# Altium PCB POV_Display.PcbDoc (part 2 of 4)
Units mm, origin at the board's own origin, x right, y up, seen from the top; angles counter-clockwise.
Board outline 207.01 x 48.01 mm, 4 copper layers (Top Layer, GND, Power, Bottom Layer), stack 1.586 mm thick; 227 components, 374 nets, 1196 pads, 657 vias.
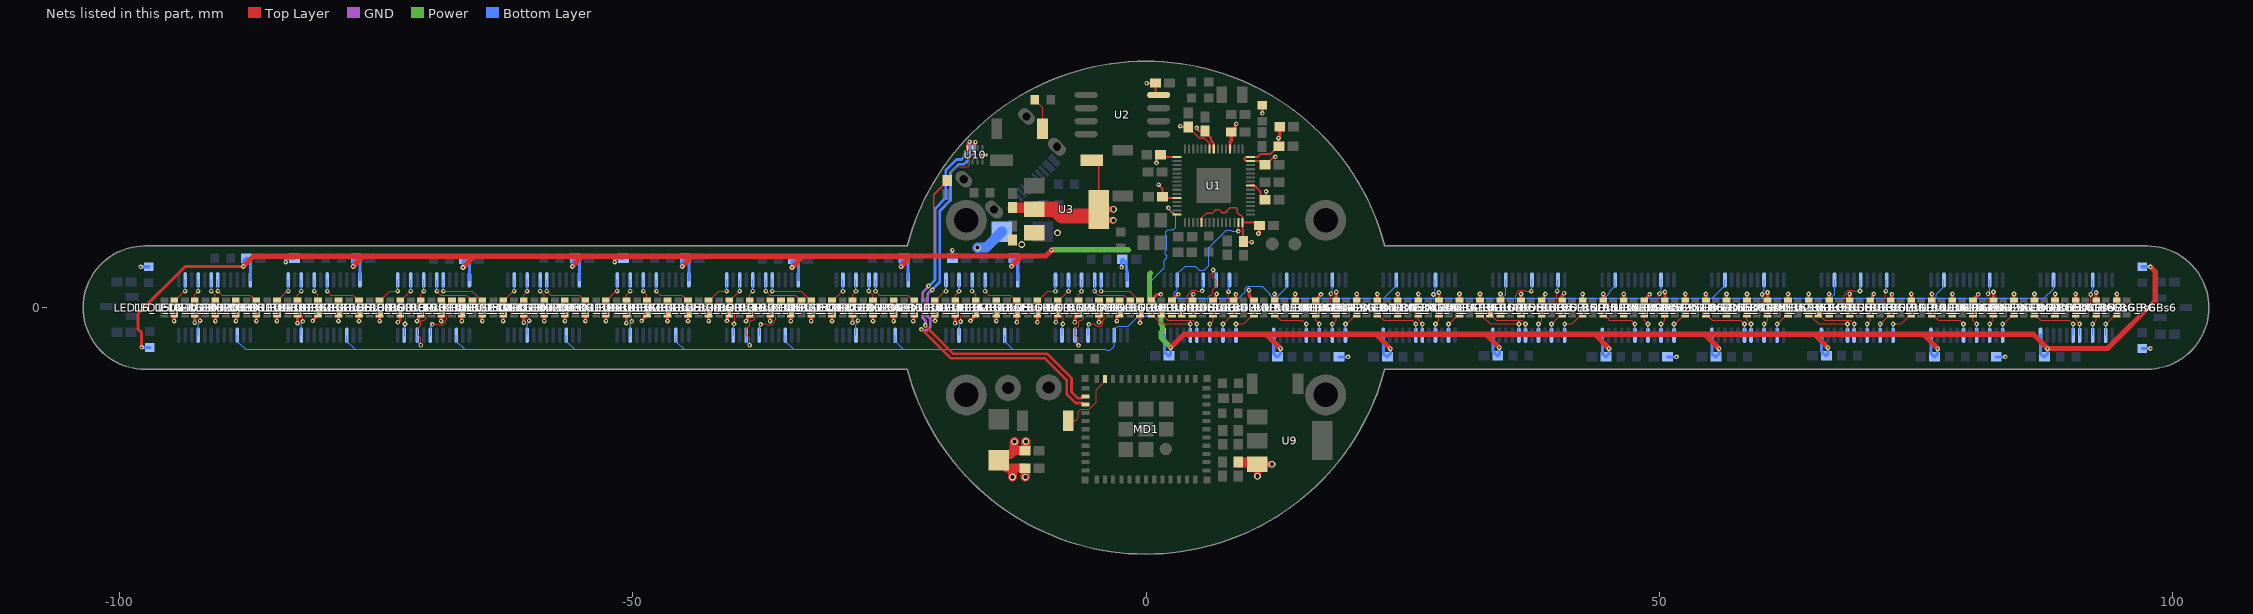
[diagram p4: the nets of this part, all layers, seen from the top]

## Via types
v1: diameter 0.45, hole 0.2, Top Layer to Bottom Layer, tented both sides, 605 vias
v2: diameter 0.65, hole 0.4, Top Layer to Bottom Layer, tented both sides, 28 vias
v3: diameter 0.5, hole 0.3, Top Layer to Bottom Layer, tented both sides, 12 vias
v4: diameter 0.45, hole 0.2, Top Layer to Bottom Layer, 12 vias

## Nets (pads, with @x,y where several pads share a name; then routed paths per layer and width w, separated by ;. In a path a pad name is that pad's centre, name@x,y a point inside that pad or via, vN(x,y) a via of type N, cw(c..) or ccw(c..) an arc to the next point about the centre after c; other vN are vias at no path point) (continued)
+3V3_RP: C4.2 C5.2 C6.2 C7.2 C8.2 C9.2 C10.2 C11.2 C12.2 C13.2 C15.2 C17.1 C21.2 C28_U_16_RGBs1.1 C28_U_16_RGBs2.1 C28_U_16_RGBs3.1 C28_U_16_RGBs4.1 C28_U_16_RGBs5.1 C28_U_16_RGBs6.1 C29_U_16_RGBs1.1 C29_U_16_RGBs2.1 C29_U_16_RGBs3.1 C29_U_16_RGBs4.1 C29_U_16_RGBs5.1 C29_U_16_RGBs6.1 C30_U_16_RGBs1.1 C30_U_16_RGBs2.1 C30_U_16_RGBs3.1 C30_U_16_RGBs4.1 C30_U_16_RGBs5.1 C30_U_16_RGBs6.1 C37.2 R3.1 R10.2 R11.2 SW5.1 U1.1 U1.11 U1.20 U1.30 U1.38 U1.44 U1.45 U1.49 U1.53 U1.54 U2.8 U3.2 U3.4 U6_U_16_RGBs1.24 U6_U_16_RGBs2.24 U6_U_16_RGBs3.24 U6_U_16_RGBs4.24 U6_U_16_RGBs5.24 U6_U_16_RGBs6.24 U7_U_16_RGBs1.24 U7_U_16_RGBs2.24 U7_U_16_RGBs3.24 U7_U_16_RGBs4.24 U7_U_16_RGBs5.24 U7_U_16_RGBs6.24 U8_U_16_RGBs1.24 U8_U_16_RGBs2.24 U8_U_16_RGBs3.24 U8_U_16_RGBs4.24 U8_U_16_RGBs5.24 U8_U_16_RGBs6.24 U10.10 | length 368.5
  Top Layer w0.1: C37.2@-19.35,12.379 -18.962,12.767 -18.962,13.126 -18.376,13.712 -17.33,13.712 -17.15,13.892 -17.15,14.508 -16.783,14.875 U10.10@-15.75,14.875
  Top Layer w0.15: -20.675,5.025 -20.675,10.981 -19.35,12.306 C37.2@-19.35,12.379 ; SW5.1@-5.275,14.35 -5.075,14.35 -4.6,13.875 U3.4@-4.6,9.575 ; C9.2@4.316,17.332 4.506,17.142 4.571,17.142 4.926,16.787 5.238,16.475 5.714,16.475 6.2,15.989 U1.54@6.2,15.45 ; U1.20@5.4,8.722 5.853,9.175 6.425,9.175 6.8,9.55 7.116,9.55 7.417,9.248 7.708,9.248 8.182,9.723 8.82,9.723 8.908,9.635 8.908,9.248 9.178,8.978 9.258,8.978 9.398,8.839 U1.30@9.398,8.3
  Top Layer w0.2: v1(0.067,21.85) 0.896,21.85 C17.1@0.921,21.875 0.921,20.904 1.12,20.705 U2.8@1.231,20.705 ; v1(1.025,14.094) C12.2@1.025,14.544 ; C12.2@1.2,14.544 1.556,14.9 1.6,14.9 C12.2@1.825,14.675 ; v1(1.225,11.981) 1.225,11.954 1.6,11.579 C11.2@1.6,10.8 1.725,10.675 U1.11@3.025,10.675 ; C12.2@1.65,14.675 U1.1@2.85,14.675 ; v1(3.344,17.675) 3.412,17.675 3.491,17.596 C9.2@4.125,17.596 ; v1(4.925,17.5) 4.925,17.432 5.031,17.326 5.031,17.284 5.119,17.196 C10.2@5.75,17.196 ; U1.20@5.4,8.3 U1.20@5.4,8.722 ; C10.2@5.75,17.123 6.321,16.552 6.321,16.279 6.475,16.126 ; 6.475,16.126 6.598,16.002 U1.53@6.599,15.45 ; U1.38@10.175,11.874 10.511,11.874 10.61,11.775 10.695,11.775 11.171,11.299 11.171,10.856 11.527,10.5 C6.2@11.6,10.5 11.7,10.6 v1(11.7,11.306) ; U1.45@10.175,14.675 9.717,14.675 9.6,14.558 9.6,14.392 9.717,14.274 U1.44@10.175,14.274 11.153,14.274 11.527,13.9 C5.2@11.6,13.9 11.673,13.9 12.406,14.633 12.552,14.633 v1(12.6,14.681) ; U1.45@10.175,14.675 10.895,14.675 11.191,14.971 12.144,14.971 12.873,15.7 C4.2@12.9,15.7 ; v1(10.281,6.375) 10.256,6.4 9.554,6.4 9.425,6.529 9.425,7.601 9.398,7.628 U1.30@9.398,8.3 10.6,8.3 C7.2@10.95,7.95 ; v1(12.9,16.506) 12.9,15.746 C4.2@12.946,15.7
  Top Layer w0.3: v1(-97.806,-3.877) -97.806,-2.454 -98.175,-2.085 -98.175,-0.604 -93.57,4.002 v1(-87.9,4.002) ; U1.49@8.199,15.45 8.198,15.451 8.198,16.141 8.3,16.244 C15.2@8.3,17.1 8.373,17.1 8.679,17.406 8.679,17.679 8.771,17.771 8.771,17.877 v1(8.8,17.906) ; v1(10.954,7.219) 10.954,7.26 11.05,7.356 C7.2@11.05,8 ; v1(11.325,18.924) R3.1@11.325,19.703 ; v1(12.9,16.506) 12.929,16.535 12.929,16.637 13.021,16.729 C13.2@13.021,17.625
  Top Layer w0.5: v1(-87.9,4.002) -86.902,5 -76.202,5 ; v1(-77.2,4.002) -76.202,5 ; v1(-66.507,3.902) -65.409,5 ; v1(-55.864,4.002) -54.866,5 ; v1(-45.164,4.002) -44.166,5 ; v1(-34.471,3.902) -33.373,5 ; v1(-23.846,3.994) -23.265,4.576 -23.265,4.824 -23.44,5 -33.373,5 ; -23.587,5.025 -20.675,5.025 -12.094,5.025 ; v1(-13.1,4.019) -12.094,5.025 ; v1(-9.184,5.6) -9.759,5.025 -12.094,5.025 ; v1(2.4,-3.894) 3.693,-2.6 11.699,-2.6 ; v1(13.093,-3.994) 11.699,-2.6 ; v1(23.793,-3.994) 22.399,-2.6 ; v1(34.4,-3.894) 33.106,-2.6 ; v1(45.093,-3.994) 43.699,-2.6 ; v1(55.792,-3.994) 54.399,-2.6 ; v1(66.4,-3.894) 65.106,-2.6 ; v1(77.093,-3.994) 75.699,-2.6 ; v1(97.806,3.977) 98.275,3.508 98.275,0.662 93.619,-3.994 v1(87.793,-3.994) 86.399,-2.6 75.699,-2.6 ; -76.202,5 -65.409,5 ; -65.409,5 -54.866,5 ; -54.866,5 -44.166,5 ; -44.166,5 -33.373,5 ; 11.699,-2.6 22.399,-2.6 ; 22.399,-2.6 33.106,-2.6 ; 33.106,-2.6 43.699,-2.6 ; 43.699,-2.6 54.399,-2.6 ; 54.399,-2.6 65.106,-2.6 ; 65.106,-2.6 75.699,-2.6
  Top Layer w0.65: v2(-3.175,8.5) -3.925,8.5 -4.6,9.175 U3.4@-4.6,9.575 v2(-3.15,9.575)
  Top Layer w1: C21.2@-13,9.746 -12.971,9.717 -11.042,9.717 U3.2@-10.9,9.575
  Top Layer w1.5: U3.2@-10.9,9.575 -8.814,9.575 -8.164,8.925 -4.85,8.925 U3.4@-4.6,9.175
  Power w0.5: v1(-9.184,5.6) -9.148,5.636 -1.736,5.636 -1.7,5.6 ; 0.45,3.35 0.35,3.25 0.35,0.853 1.45,-0.247 1.45,-1.612 1.6,-1.762 1.6,-2.238 1.45,-2.388 1.45,-2.944 v1(2.4,-3.894)
  Bottom Layer w0.3: v1(-97.806,-3.877) R10.2@-97,-3.877 ; v1(-87.9,4.002) -87.9,4.515 C30_U_16_RGBs3.1@-87.607,4.808 -87.534,4.808 -87.215,4.488 U8_U_16_RGBs3.24@-87.215,2.7 ; v1(-77.2,4.002) -77.2,4.515 C29_U_16_RGBs3.1@-76.908,4.808 -76.851,4.808 -76.545,4.502 U7_U_16_RGBs3.24@-76.545,2.7 ; v1(-66.507,3.902) -66.507,4.562 C28_U_16_RGBs3.1@-66.361,4.708 -66.288,4.708 -65.896,4.315 -65.896,2.711 U6_U_16_RGBs3.24@-65.885,2.7 ; v1(-55.864,4.002) -55.864,4.516 C30_U_16_RGBs2.1@-55.571,4.808 -55.498,4.808 -55.179,4.489 U8_U_16_RGBs2.24@-55.179,2.701 ; v1(-45.164,4.002) -45.164,4.516 C29_U_16_RGBs2.1@-44.871,4.808 -44.815,4.808 -44.509,4.502 U7_U_16_RGBs2.24@-44.509,2.701 ; v1(-34.471,3.902) -34.471,4.563 C28_U_16_RGBs2.1@-34.325,4.708 -34.252,4.708 -33.859,4.315 -33.859,2.711 U6_U_16_RGBs2.24@-33.849,2.701 ; v1(-23.846,3.994) -23.846,4.507 C30_U_16_RGBs1.1@-23.554,4.8 -23.481,4.8 -23.161,4.481 U8_U_16_RGBs1.24@-23.161,2.692 ; v1(-13.1,4.019) -13.1,4.554 C29_U_16_RGBs1.1@-12.854,4.8 -12.798,4.8 -12.491,4.494 U7_U_16_RGBs1.24@-12.491,2.692 ; v1(-2.376,3.919) -2.376,4.631 C28_U_16_RGBs1.1@-2.308,4.7 -2.235,4.7 -1.929,4.394 -1.929,4.143 -1.89,4.105 -1.89,3.685 -1.842,3.636 -1.842,2.703 U6_U_16_RGBs1.24@-1.831,2.692 ; U6_U_16_RGBs4.24@1.777,-2.692 1.788,-2.703 1.788,-4.307 2.181,-4.7 C28_U_16_RGBs4.1@2.254,-4.7 2.4,-4.554 v1(2.4,-3.894) ; U7_U_16_RGBs4.24@12.438,-2.692 12.438,-4.494 12.744,-4.8 C29_U_16_RGBs4.1@12.8,-4.8 13.093,-4.508 v1(13.093,-3.994) ; U8_U_16_RGBs4.24@23.108,-2.692 23.108,-4.481 23.427,-4.8 C30_U_16_RGBs4.1@23.5,-4.8 23.793,-4.507 v1(23.793,-3.994) ; U6_U_16_RGBs5.24@33.777,-2.692 33.788,-2.703 33.788,-4.307 34.181,-4.7 C28_U_16_RGBs5.1@34.254,-4.7 34.4,-4.554 v1(34.4,-3.894) ; U7_U_16_RGBs5.24@44.438,-2.692 44.438,-4.494 44.744,-4.8 C29_U_16_RGBs5.1@44.8,-4.8 45.093,-4.508 v1(45.093,-3.994) ; U8_U_16_RGBs5.24@55.107,-2.692 55.107,-4.481 55.427,-4.8 C30_U_16_RGBs5.1@55.5,-4.8 55.792,-4.507 v1(55.792,-3.994) ; U6_U_16_RGBs6.24@65.778,-2.692 65.788,-2.703 65.788,-4.307 66.181,-4.7 C28_U_16_RGBs6.1@66.254,-4.7 66.4,-4.554 v1(66.4,-3.894) ; U7_U_16_RGBs6.24@76.438,-2.692 76.438,-4.494 76.744,-4.8 C29_U_16_RGBs6.1@76.8,-4.8 77.093,-4.508 v1(77.093,-3.994) ; U8_U_16_RGBs6.24@87.108,-2.692 87.108,-4.481 87.427,-4.8 C30_U_16_RGBs6.1@87.5,-4.8 87.793,-4.507 v1(87.793,-3.994) ; R11.2@97,3.977 v1(97.806,3.977)
+5V: C20.2 C22.1 C23.1 C31_U_16_RGBs1.2 C31_U_16_RGBs2.2 C31_U_16_RGBs3.2 C31_U_16_RGBs4.2 C31_U_16_RGBs5.2 C31_U_16_RGBs6.2 C35.2 D1.1 D2.1 LED1_U_16_RGBs1.2 LED1_U_16_RGBs2.2 LED1_U_16_RGBs3.2 LED1_U_16_RGBs4.2 LED1_U_16_RGBs5.2 LED1_U_16_RGBs6.2 LED2_U_16_RGBs1.2 LED2_U_16_RGBs2.2 LED2_U_16_RGBs3.2 LED2_U_16_RGBs4.2 LED2_U_16_RGBs5.2 LED2_U_16_RGBs6.2 LED3_U_16_RGBs1.2 LED3_U_16_RGBs2.2 LED3_U_16_RGBs3.2 LED3_U_16_RGBs4.2 LED3_U_16_RGBs5.2 LED3_U_16_RGBs6.2 LED4_U_16_RGBs1.2 LED4_U_16_RGBs2.2 LED4_U_16_RGBs3.2 LED4_U_16_RGBs4.2 LED4_U_16_RGBs5.2 LED4_U_16_RGBs6.2 LED5_U_16_RGBs1.2 LED5_U_16_RGBs2.2 LED5_U_16_RGBs3.2 LED5_U_16_RGBs4.2 LED5_U_16_RGBs5.2 LED5_U_16_RGBs6.2 LED6_U_16_RGBs1.2 LED6_U_16_RGBs2.2 LED6_U_16_RGBs3.2 LED6_U_16_RGBs4.2 LED6_U_16_RGBs5.2 LED6_U_16_RGBs6.2 LED7_U_16_RGBs1.2 LED7_U_16_RGBs2.2 LED7_U_16_RGBs3.2 LED7_U_16_RGBs4.2 LED7_U_16_RGBs5.2 LED7_U_16_RGBs6.2 LED8_U_16_RGBs1.2 LED8_U_16_RGBs2.2 LED8_U_16_RGBs3.2 LED8_U_16_RGBs4.2 LED8_U_16_RGBs5.2 LED8_U_16_RGBs6.2 LED9_U_16_RGBs1.2 LED9_U_16_RGBs2.2 LED9_U_16_RGBs3.2 LED9_U_16_RGBs4.2 LED9_U_16_RGBs5.2 LED9_U_16_RGBs6.2 LED10_U_16_RGBs1.2 LED10_U_16_RGBs2.2 LED10_U_16_RGBs3.2 LED10_U_16_RGBs4.2 LED10_U_16_RGBs5.2 LED10_U_16_RGBs6.2 LED11_U_16_RGBs1.2 LED11_U_16_RGBs2.2 LED11_U_16_RGBs3.2 LED11_U_16_RGBs4.2 LED11_U_16_RGBs5.2 LED11_U_16_RGBs6.2 LED12_U_16_RGBs1.2 LED12_U_16_RGBs2.2 LED12_U_16_RGBs3.2 LED12_U_16_RGBs4.2 LED12_U_16_RGBs5.2 LED12_U_16_RGBs6.2 LED13_U_16_RGBs1.2 LED13_U_16_RGBs2.2 LED13_U_16_RGBs3.2 LED13_U_16_RGBs4.2 LED13_U_16_RGBs5.2 LED13_U_16_RGBs6.2 LED14_U_16_RGBs1.2 LED14_U_16_RGBs2.2 LED14_U_16_RGBs3.2 LED14_U_16_RGBs4.2 LED14_U_16_RGBs5.2 LED14_U_16_RGBs6.2 LED15_U_16_RGBs1.2 LED15_U_16_RGBs2.2 LED15_U_16_RGBs3.2 LED15_U_16_RGBs4.2 LED15_U_16_RGBs5.2 LED15_U_16_RGBs6.2 LED16_U_16_RGBs1.2 LED16_U_16_RGBs2.2 LED16_U_16_RGBs3.2 LED16_U_16_RGBs4.2 LED16_U_16_RGBs5.2 LED16_U_16_RGBs6.2 R9.2 R12.2 U3.3 U9.3 | length 98.9
  Top Layer w0.3: v1(-94.632,-1.313) LED16_U_16_RGBs3.2@-94.632,-0.612 ; v1(-92.632,-1.467) LED15_U_16_RGBs3.2@-92.632,-0.612 ; v1(-90.632,-1.313) LED14_U_16_RGBs3.2@-90.632,-0.612 ; v1(-88.632,-1.313) LED13_U_16_RGBs3.2@-88.632,-0.612 ; v1(-86.632,-1.313) LED12_U_16_RGBs3.2@-86.632,-0.612 ; v1(-84.632,-1.313) LED11_U_16_RGBs3.2@-84.632,-0.612 ; v1(-82.632,-1.517) LED10_U_16_RGBs3.2@-82.632,-0.612 ; v1(-81.15,-1.282) -81.15,-1.258 -80.857,-0.966 -80.857,-0.813 -80.657,-0.612 LED9_U_16_RGBs3.2@-80.632,-0.612 ; v1(-78.632,-1.313) LED8_U_16_RGBs3.2@-78.632,-0.612 ; v1(-76.632,-1.313) LED7_U_16_RGBs3.2@-76.632,-0.612 ; v1(-74.632,-1.313) LED6_U_16_RGBs3.2@-74.632,-0.612 ; v1(-72.85,-1.425) -72.632,-1.207 LED5_U_16_RGBs3.2@-72.632,-0.612 ; v1(-70.991,-1.313) -70.991,-1.272 -70.857,-1.138 -70.857,-0.813 -70.657,-0.612 LED4_U_16_RGBs3.2@-70.632,-0.612 ; v1(-68.632,-1.313) LED3_U_16_RGBs3.2@-68.632,-0.612 ; v1(-66.632,-1.313) LED2_U_16_RGBs3.2@-66.632,-0.612 ; v1(-64.632,-1.313) LED1_U_16_RGBs3.2@-64.632,-0.612 ; v1(-62.596,-1.312) LED16_U_16_RGBs2.2@-62.596,-0.612 ; v1(-60.596,-1.467) LED15_U_16_RGBs2.2@-60.596,-0.612 ; v1(-58.596,-1.312) LED14_U_16_RGBs2.2@-58.596,-0.612 ; v1(-56.596,-1.312) LED13_U_16_RGBs2.2@-56.596,-0.612 ; v1(-54.596,-1.312) LED12_U_16_RGBs2.2@-54.596,-0.612 ; v1(-52.596,-1.312) LED11_U_16_RGBs2.2@-52.596,-0.612 ; v1(-50.596,-1.517) LED10_U_16_RGBs2.2@-50.596,-0.612 ; v1(-49.113,-1.282) -49.113,-1.257 -48.821,-0.965 -48.821,-0.812 -48.62,-0.612 LED9_U_16_RGBs2.2@-48.596,-0.612 ; v1(-46.596,-1.312) LED8_U_16_RGBs2.2@-46.596,-0.612 ; v1(-44.596,-1.312) LED7_U_16_RGBs2.2@-44.596,-0.612 ; v1(-42.596,-1.312) LED6_U_16_RGBs2.2@-42.596,-0.612 ; v1(-40.8,-1.287) -40.771,-1.258 -40.771,-0.787 LED5_U_16_RGBs2.2@-40.596,-0.612 ; v1(-38.955,-1.312) -38.955,-1.272 -38.821,-1.137 -38.821,-0.812 -38.62,-0.612 LED4_U_16_RGBs2.2@-38.596,-0.612 ; v1(-36.596,-1.312) LED3_U_16_RGBs2.2@-36.596,-0.612 ; v1(-34.596,-1.312) LED2_U_16_RGBs2.2@-34.596,-0.612 ; v1(-32.596,-1.312) LED1_U_16_RGBs2.2@-32.596,-0.612 ; v1(-30.579,-1.32) LED16_U_16_RGBs1.2@-30.579,-0.62 ; v1(-28.579,-1.475) LED15_U_16_RGBs1.2@-28.579,-0.62 ; v1(-26.579,-1.32) LED14_U_16_RGBs1.2@-26.579,-0.62 ; v1(-24.579,-1.32) LED13_U_16_RGBs1.2@-24.579,-0.62 ; v1(-22.664,-1.32) -22.664,-1.28 -22.579,-1.194 LED12_U_16_RGBs1.2@-22.579,-0.62 ; LED11_U_16_RGBs1.2@-20.579,-0.62 -20.563,-0.635 -20.563,-1.28 v1(-20.548,-1.295) ; v1(-18.579,-1.525) LED10_U_16_RGBs1.2@-18.579,-0.62 ; v1(-17.096,-1.29) -17.096,-1.266 -16.804,-0.973 -16.804,-0.82 -16.603,-0.62 LED9_U_16_RGBs1.2@-16.579,-0.62 ; v1(-14.579,-1.32) LED8_U_16_RGBs1.2@-14.579,-0.62 ; v1(-12.579,-1.425) LED7_U_16_RGBs1.2@-12.579,-0.62 ; v1(-10.579,-1.425) LED6_U_16_RGBs1.2@-10.579,-0.62 ; v1(-8.775,-1.425) -8.746,-1.396 -8.746,-0.787 LED5_U_16_RGBs1.2@-8.579,-0.62 ; v1(-6.938,-1.425) -6.909,-1.396 -6.909,-1.079 -6.804,-0.973 -6.804,-0.82 -6.603,-0.62 LED4_U_16_RGBs1.2@-6.579,-0.62 ; v1(-4.579,-1.425) LED3_U_16_RGBs1.2@-4.579,-0.62 ; v1(-2.841,-1.32) -2.841,-1.28 -2.804,-1.242 -2.804,-0.82 -2.603,-0.62 LED2_U_16_RGBs1.2@-2.579,-0.62 ; v1(-0.583,-1.479) -0.581,-1.477 -0.581,-0.622 LED1_U_16_RGBs1.2@-0.579,-0.62 ; LED1_U_16_RGBs4.2@0.525,0.62 0.549,0.62 0.75,0.82 0.75,0.973 1.043,1.267 1.413,1.267 v1(1.441,1.295) ; LED2_U_16_RGBs4.2@2.525,0.62 2.549,0.62 2.75,0.82 2.75,0.973 2.997,1.22 3.032,1.22 3.107,1.295 v1(3.148,1.295) ; LED3_U_16_RGBs4.2@4.525,0.62 4.525,1.173 4.613,1.261 v1(4.613,1.302) ; LED4_U_16_RGBs4.2@6.525,0.62 6.549,0.62 6.75,0.82 6.75,1.146 6.884,1.28 v1(6.884,1.32) ; LED5_U_16_RGBs4.2@8.525,0.62 8.721,0.816 8.721,1.267 v1(8.75,1.295) ; v1(10.018,1.711) 10.047,1.682 10.047,1.242 10.1,1.189 10.1,1.021 10.501,0.62 LED6_U_16_RGBs4.2@10.525,0.62 ; LED7_U_16_RGBs4.2@12.525,0.62 v1(12.525,1.32) ; LED8_U_16_RGBs4.2@14.525,0.62 v1(14.525,1.32) ; LED9_U_16_RGBs4.2@16.525,0.62 16.549,0.62 16.75,0.82 16.75,0.973 17.042,1.266 v1(17.042,1.29) ; LED10_U_16_RGBs4.2@18.525,0.62 v1(18.525,1.525) ; LED11_U_16_RGBs4.2@20.525,0.62 v1(20.525,1.32) ; LED12_U_16_RGBs4.2@22.525,0.62 v1(22.525,1.32) ; LED13_U_16_RGBs4.2@24.525,0.62 v1(24.525,1.32) ; LED14_U_16_RGBs4.2@26.525,0.62 v1(26.525,1.32) ; LED15_U_16_RGBs4.2@28.525,0.62 v1(28.525,1.475) ; LED16_U_16_RGBs4.2@30.525,0.62 v1(30.525,1.32) ; LED1_U_16_RGBs5.2@32.525,0.62 v1(32.525,1.32) ; LED2_U_16_RGBs5.2@34.525,0.62 v1(34.525,1.32) ; LED3_U_16_RGBs5.2@36.525,0.62 v1(36.525,1.32) ; LED4_U_16_RGBs5.2@38.525,0.62 38.549,0.62 38.75,0.82 38.75,1.146 38.884,1.28 v1(38.884,1.32) ; LED5_U_16_RGBs5.2@40.525,0.62 40.525,1.2 v1(40.725,1.4) ; LED6_U_16_RGBs5.2@42.525,0.62 v1(42.525,1.32) ; LED7_U_16_RGBs5.2@44.525,0.62 v1(44.525,1.32) ; LED8_U_16_RGBs5.2@46.525,0.62 v1(46.525,1.32) ; LED9_U_16_RGBs5.2@48.525,0.62 48.549,0.62 48.75,0.82 48.75,0.973 49.042,1.266 v1(49.042,1.29) ; LED10_U_16_RGBs5.2@50.525,0.62 v1(50.525,1.525) ; LED11_U_16_RGBs5.2@52.525,0.62 v1(52.525,1.32) ; LED12_U_16_RGBs5.2@54.525,0.62 v1(54.525,1.32) ; LED13_U_16_RGBs5.2@56.525,0.62 v1(56.525,1.32) ; LED14_U_16_RGBs5.2@58.525,0.62 v1(58.525,1.32) ; LED15_U_16_RGBs5.2@60.525,0.62 v1(60.525,1.475) ; LED16_U_16_RGBs5.2@62.525,0.62 v1(62.525,1.32) ; LED1_U_16_RGBs6.2@64.525,0.62 v1(64.525,1.32) ; LED2_U_16_RGBs6.2@66.525,0.62 v1(66.525,1.32) ; LED3_U_16_RGBs6.2@68.525,0.62 v1(68.525,1.32) ; LED4_U_16_RGBs6.2@70.525,0.62 70.549,0.62 70.75,0.82 70.75,1.146 70.884,1.28 v1(70.884,1.32) ; LED5_U_16_RGBs6.2@72.525,0.62 72.596,0.691 72.596,1.267 v1(72.625,1.295) ; LED6_U_16_RGBs6.2@74.525,0.62 v1(74.525,1.32) ; LED7_U_16_RGBs6.2@76.525,0.62 v1(76.525,1.32) ; LED8_U_16_RGBs6.2@78.525,0.62 v1(78.525,1.32) ; LED9_U_16_RGBs6.2@80.525,0.62 80.549,0.62 80.75,0.82 80.75,0.973 81.042,1.266 v1(81.042,1.29) ; LED10_U_16_RGBs6.2@82.525,0.62 v1(82.525,1.525) ; LED11_U_16_RGBs6.2@84.525,0.62 v1(84.525,1.32) ; LED12_U_16_RGBs6.2@86.525,0.62 v1(86.525,1.32) ; LED13_U_16_RGBs6.2@88.525,0.62 v1(88.525,1.32) ; LED14_U_16_RGBs6.2@90.525,0.62 v1(90.525,1.32) ; LED15_U_16_RGBs6.2@92.525,0.62 v1(92.525,1.475) ; LED16_U_16_RGBs6.2@94.525,0.62 94.536,0.63 94.536,1.312 v1(94.546,1.323)
  Top Layer w0.65: v2(10.85,-16.425) U9.3@10.85,-15.25 v2(12.275,-15.25)
  Top Layer w0.9: v2(-13,-16.5) -13,-15.625 ; v2(-12.8,-13.05) -12.8,-13.1 -12.854,-13.154 -12.854,-13.925 ; v2(-11.75,-16.506) -11.75,-15.631 -11.756,-15.625 C23.1@-11.779,-15.625 -13,-15.625 ; v2(-11.7,-13.044) -11.7,-13.919 -11.706,-13.925 C22.1@-11.775,-13.925 -12.854,-13.925 ; -13,-15.625 -13.55,-15.625 D2.1@-14.325,-14.85 -13.775,-14.3 -13.229,-14.3 -12.854,-13.925
  Top Layer w1: C35.2@9,-15.05 9.029,-15.079 10.679,-15.079 U9.3@10.85,-15.25
  Bottom Layer w0.3: v1(-97.906,3.977) R9.2@-97.1,3.977 ; v1(-83.787,4.425) -83.781,4.431 -83.781,4.683 -83.664,4.8 -82.915,4.8 C31_U_16_RGBs3.2@-82.907,4.808 ; v1(-51.75,4.425) -51.744,4.431 -51.744,4.683 -51.627,4.8 -50.879,4.8 C31_U_16_RGBs2.2@-50.871,4.808 ; C31_U_16_RGBs1.2@-18.854,4.8 -18.854,5.596 v1(-18.85,5.6) ; C31_U_16_RGBs4.2@18.8,-4.8 v1(19.679,-4.8) ; C31_U_16_RGBs5.2@50.8,-4.8 v1(51.679,-4.8) ; C31_U_16_RGBs6.2@82.8,-4.8 v1(83.679,-4.8) ; R12.2@97,-3.977 v1(97.806,-3.977)
  Bottom Layer w1: v2(-16.392,5.841) -16.378,5.856 -15.569,5.856 D1.1@-14.05,7.375
  other v2: -12.1,6.15 -8.625,7.275
B0_U_16_RGBs1: LED1_U_16_RGBs1.1 U6_U_16_RGBs1.20 | length 5.3
  Top Layer w0.1: v1(-4.371,1.592) -1.564,1.592 -1.004,1.032 -1.004,1.021 -0.603,0.62 LED1_U_16_RGBs1.1@-0.579,0.62
  Bottom Layer w0.1: v1(-4.371,1.592) U6_U_16_RGBs1.20@-4.371,2.692
B0_U_16_RGBs2: LED1_U_16_RGBs2.1 U6_U_16_RGBs2.20 | length 5.3
  Top Layer w0.1: v1(-36.389,1.6) -33.581,1.6 -33.022,1.041 -33.022,1.029 -32.62,0.628 LED1_U_16_RGBs2.1@-32.596,0.628
  Bottom Layer w0.1: v1(-36.389,1.6) U6_U_16_RGBs2.20@-36.389,2.701
B0_U_16_RGBs3: LED1_U_16_RGBs3.1 U6_U_16_RGBs3.20 | length 5.3
  Top Layer w0.1: v1(-68.425,1.599) -65.617,1.599 -65.058,1.04 -65.058,1.029 -64.657,0.627 LED1_U_16_RGBs3.1@-64.632,0.627
  Bottom Layer w0.1: v1(-68.425,1.599) U6_U_16_RGBs3.20@-68.425,2.7
B0_U_16_RGBs4: LED1_U_16_RGBs4.1 U6_U_16_RGBs4.20 | length 5.3
  Top Layer w0.1: LED1_U_16_RGBs4.1@0.525,-0.62 0.549,-0.62 0.95,-1.021 0.95,-1.032 1.51,-1.592 v1(4.317,-1.592)
  Bottom Layer w0.1: U6_U_16_RGBs4.20@4.317,-2.692 v1(4.317,-1.592)
B0_U_16_RGBs5: LED1_U_16_RGBs5.1 U6_U_16_RGBs5.20 | length 5.3
  Top Layer w0.1: LED1_U_16_RGBs5.1@32.525,-0.62 32.549,-0.62 32.95,-1.021 32.95,-1.032 33.51,-1.592 v1(36.317,-1.592)
  Bottom Layer w0.1: U6_U_16_RGBs5.20@36.317,-2.692 v1(36.317,-1.592)
B0_U_16_RGBs6: LED1_U_16_RGBs6.1 U6_U_16_RGBs6.20 | length 5.3
  Top Layer w0.1: LED1_U_16_RGBs6.1@64.525,-0.62 64.549,-0.62 64.95,-1.021 64.95,-1.032 65.51,-1.592 v1(68.318,-1.592)
  Bottom Layer w0.1: U6_U_16_RGBs6.20@68.318,-2.692 v1(68.318,-1.592)
B1_U_16_RGBs1: LED2_U_16_RGBs1.1 U6_U_16_RGBs1.7 | length 5.9
  Top Layer w0.1: v1(-5.558,-1.624) -5.526,-1.592 -5.037,-1.592 -4.933,-1.695 -4.839,-1.695 -4.734,-1.8 -4.424,-1.8 -4.204,-1.58 -4.204,-1.476 -4.204,-1.296 -4.054,-1.146 -4.054,-0.208 -3.846,0 -3.211,0 -3.004,0.207 -3.004,0.219 -2.603,0.62 LED2_U_16_RGBs1.1@-2.579,0.62
  Bottom Layer w0.1: U6_U_16_RGBs1.7@-5.641,-2.692 -5.641,-1.802 -5.558,-1.719 v1(-5.558,-1.624)
B1_U_16_RGBs2: LED2_U_16_RGBs2.1 U6_U_16_RGBs2.7 | length 5.7
  Top Layer w0.1: v1(-37.525,-1.625) -37.484,-1.584 -37.054,-1.584 -36.951,-1.687 -36.441,-1.687 -36.221,-1.467 -36.221,-1.288 -36.071,-1.138 -36.071,-0.199 -35.864,0.008 -35.229,0.008 -35.022,0.215 -35.022,0.227 -34.62,0.628 LED2_U_16_RGBs2.1@-34.596,0.628
  Bottom Layer w0.1: U6_U_16_RGBs2.7@-37.659,-2.684 -37.61,-2.635 -37.61,-1.805 -37.525,-1.72 v1(-37.525,-1.625)
B1_U_16_RGBs3: LED2_U_16_RGBs3.1 U6_U_16_RGBs3.7 | length 5.7
  Top Layer w0.1: v1(-69.5,-1.625) -69.475,-1.6 -69.075,-1.6 -68.987,-1.688 -68.477,-1.688 -68.257,-1.468 -68.257,-1.289 -68.107,-1.139 -68.107,-0.2 -67.9,0.008 -67.265,0.008 -67.058,0.215 -67.058,0.226 -66.657,0.627 LED2_U_16_RGBs3.1@-66.632,0.627
  Bottom Layer w0.1: U6_U_16_RGBs3.7@-69.695,-2.685 -69.646,-2.636 -69.646,-1.866 -69.5,-1.72 v1(-69.5,-1.625)
B1_U_16_RGBs4: LED2_U_16_RGBs4.1 U6_U_16_RGBs4.7 | length 5.7
  Top Layer w0.1: LED2_U_16_RGBs4.1@2.525,-0.62 2.549,-0.62 2.95,-0.219 2.95,-0.207 3.157,0 3.792,0 4,0.208 4,1.133 4.246,1.379 4.246,1.465 4.476,1.695 4.88,1.695 4.983,1.592 5.442,1.592 v1(5.475,1.625)
  Bottom Layer w0.1: v1(5.475,1.625) 5.539,1.689 5.539,2.643 U6_U_16_RGBs4.7@5.587,2.692
B1_U_16_RGBs5: LED2_U_16_RGBs5.1 U6_U_16_RGBs5.7 | length 5.8
  Top Layer w0.1: LED2_U_16_RGBs5.1@34.525,-0.62 34.549,-0.62 34.95,-0.219 34.95,-0.207 35.157,0 35.792,0 36,0.208 36,1.146 36.15,1.296 36.15,1.476 36.37,1.695 36.88,1.695 36.983,1.592 37.517,1.592 v1(37.525,1.6)
  Bottom Layer w0.1: v1(37.525,1.6) 37.556,1.631 37.556,2.661 U6_U_16_RGBs5.7@37.587,2.692
B1_U_16_RGBs6: LED2_U_16_RGBs6.1 U6_U_16_RGBs6.7 | length 5.8
  Top Layer w0.1: LED2_U_16_RGBs6.1@66.525,-0.62 66.549,-0.62 66.95,-0.219 66.95,-0.207 67.157,0 67.793,0 68,0.208 68,1.146 68.15,1.296 68.15,1.476 68.37,1.695 68.88,1.695 68.983,1.592 69.496,1.592 v1(69.524,1.621)
  Bottom Layer w0.1: v1(69.524,1.621) 69.556,1.652 69.556,2.661 U6_U_16_RGBs6.7@69.588,2.692
B2_U_16_RGBs1: LED3_U_16_RGBs1.1 U6_U_16_RGBs1.11 | length 6.4
  Top Layer w0.1: v1(-8.104,-1.598) -8.054,-1.548 -8.054,-0.7 -8.054,-0.207 -7.766,0.081 -5.118,0.081 -4.904,0.295 -4.904,0.319 -4.603,0.62 LED3_U_16_RGBs1.1@-4.579,0.62
  Bottom Layer w0.1: U6_U_16_RGBs1.11@-8.181,-2.692 -8.143,-2.654 -8.143,-1.636 v1(-8.104,-1.598)
B2_U_16_RGBs2: LED3_U_16_RGBs2.1 U6_U_16_RGBs2.11 | length 6.4
  Top Layer w0.1: v1(-40.121,-1.589) -40.072,-1.54 -40.072,-0.692 ; -40.071,-0.691 -40.071,-0.199 -39.783,0.089 -37.135,0.089 -36.921,0.303 -36.921,0.327 -36.62,0.628 LED3_U_16_RGBs2.1@-36.596,0.628
  Bottom Layer w0.1: U6_U_16_RGBs2.11@-40.199,-2.684 -40.16,-2.645 -40.16,-1.628 v1(-40.121,-1.589)
B2_U_16_RGBs3: LED3_U_16_RGBs3.1 U6_U_16_RGBs3.11 | length 6.4
  Top Layer w0.1: v1(-72.158,-1.59) -72.108,-1.54 -72.108,-0.693 ; -72.107,-0.692 -72.107,-0.2 -71.819,0.088 -69.171,0.088 -68.957,0.303 -68.957,0.327 -68.657,0.627 LED3_U_16_RGBs3.1@-68.632,0.627
  Bottom Layer w0.1: U6_U_16_RGBs3.11@-72.235,-2.685 -72.196,-2.646 -72.196,-1.629 v1(-72.158,-1.59)
B2_U_16_RGBs4: LED3_U_16_RGBs4.1 U6_U_16_RGBs4.11 | length 6.4
  Top Layer w0.1: LED3_U_16_RGBs4.1@4.525,-0.62 4.549,-0.62 4.85,-0.319 4.85,-0.295 5.064,-0.081 7.712,-0.081 8,0.207 8,1.529 v1(8.029,1.559)
  Bottom Layer w0.1: v1(8.029,1.559) 8.079,1.608 8.079,2.643 U6_U_16_RGBs4.11@8.127,2.692
B2_U_16_RGBs5: LED3_U_16_RGBs5.1 U6_U_16_RGBs5.11 | length 6.4
  Top Layer w0.1: LED3_U_16_RGBs5.1@36.525,-0.62 36.549,-0.62 36.85,-0.319 36.85,-0.295 37.064,-0.081 39.712,-0.081 40,0.207 40,0.7 ; 40,0.7 40,1.548 v1(40.05,1.598)
  Bottom Layer w0.1: v1(40.05,1.598) 40.089,1.636 40.089,2.654 U6_U_16_RGBs5.11@40.127,2.692
B2_U_16_RGBs6: LED3_U_16_RGBs6.1 U6_U_16_RGBs6.11 | length 6.4
  Top Layer w0.1: LED3_U_16_RGBs6.1@68.525,-0.62 68.549,-0.62 68.85,-0.319 68.85,-0.295 69.064,-0.081 71.712,-0.081 72,0.207 72,0.7 ; 72,0.7 72,1.548 v1(72.05,1.598)
  Bottom Layer w0.1: v1(72.05,1.598) 72.089,1.636 72.089,2.654 U6_U_16_RGBs6.11@72.128,2.692
B3_U_16_RGBs1: LED4_U_16_RGBs1.1 U6_U_16_RGBs1.17 | length 2.2
  Top Layer w0.1: LED4_U_16_RGBs1.1@-6.579,0.62 -6.579,1.27 -6.276,1.573 v1(-6.276,1.592)
  Bottom Layer w0.1: v1(-6.276,1.592) U6_U_16_RGBs1.17@-6.276,2.692
B3_U_16_RGBs2: LED4_U_16_RGBs2.1 U6_U_16_RGBs2.17 | length 2.2
  Top Layer w0.1: LED4_U_16_RGBs2.1@-38.596,0.628 -38.596,1.278 -38.294,1.581 v1(-38.294,1.6)
  Bottom Layer w0.1: v1(-38.294,1.6) U6_U_16_RGBs2.17@-38.294,2.701
B3_U_16_RGBs3: LED4_U_16_RGBs3.1 U6_U_16_RGBs3.17 | length 2.2
  Top Layer w0.1: LED4_U_16_RGBs3.1@-70.632,0.627 -70.632,1.278 -70.33,1.58 v1(-70.33,1.599)
  Bottom Layer w0.1: v1(-70.33,1.599) U6_U_16_RGBs3.17@-70.33,2.7
B3_U_16_RGBs4: LED4_U_16_RGBs4.1 U6_U_16_RGBs4.17 | length 2.2
  Top Layer w0.1: v1(6.222,-1.592) 6.222,-1.573 6.525,-1.27 LED4_U_16_RGBs4.1@6.525,-0.62
  Bottom Layer w0.1: U6_U_16_RGBs4.17@6.222,-2.692 v1(6.222,-1.592)
B3_U_16_RGBs5: LED4_U_16_RGBs5.1 U6_U_16_RGBs5.17 | length 2.2
  Top Layer w0.1: v1(38.222,-1.592) 38.222,-1.573 38.525,-1.27 LED4_U_16_RGBs5.1@38.525,-0.62
  Bottom Layer w0.1: U6_U_16_RGBs5.17@38.222,-2.692 v1(38.222,-1.592)
B3_U_16_RGBs6: LED4_U_16_RGBs6.1 U6_U_16_RGBs6.17 | length 2.2
  Top Layer w0.1: v1(70.223,-1.592) 70.223,-1.573 70.525,-1.27 LED4_U_16_RGBs6.1@70.525,-0.62
  Bottom Layer w0.1: U6_U_16_RGBs6.17@70.223,-2.692 v1(70.223,-1.592)
B4_U_16_RGBs1: LED5_U_16_RGBs1.1 U6_U_16_RGBs1.15 | length 2.5
  Top Layer w0.1: LED5_U_16_RGBs1.1@-8.579,0.62 -8.555,0.62 -7.583,1.592 v1(-7.546,1.592)
  Bottom Layer w0.1: v1(-7.546,1.592) U6_U_16_RGBs1.15@-7.546,2.692
B4_U_16_RGBs2: LED5_U_16_RGBs2.1 U6_U_16_RGBs2.15 | length 2.5
  Top Layer w0.1: LED5_U_16_RGBs2.1@-40.596,0.628 -40.572,0.628 -39.6,1.6 v1(-39.564,1.6)
  Bottom Layer w0.1: v1(-39.564,1.6) U6_U_16_RGBs2.15@-39.564,2.701
B4_U_16_RGBs3: LED5_U_16_RGBs3.1 U6_U_16_RGBs3.15 | length 2.5
  Top Layer w0.1: LED5_U_16_RGBs3.1@-72.632,0.627 -72.608,0.627 -71.636,1.599 v1(-71.6,1.599)
  Bottom Layer w0.1: v1(-71.6,1.599) U6_U_16_RGBs3.15@-71.6,2.7
B4_U_16_RGBs4: LED5_U_16_RGBs4.1 U6_U_16_RGBs4.15 | length 2.5
  Top Layer w0.1: v1(7.492,-1.592) 7.529,-1.592 8.501,-0.62 LED5_U_16_RGBs4.1@8.525,-0.62
  Bottom Layer w0.1: U6_U_16_RGBs4.15@7.492,-2.692 v1(7.492,-1.592)
B4_U_16_RGBs5: LED5_U_16_RGBs5.1 U6_U_16_RGBs5.15 | length 2.5
  Top Layer w0.1: v1(39.492,-1.592) 39.529,-1.592 40.501,-0.62 LED5_U_16_RGBs5.1@40.525,-0.62
  Bottom Layer w0.1: U6_U_16_RGBs5.15@39.492,-2.692 v1(39.492,-1.592)
B4_U_16_RGBs6: LED5_U_16_RGBs6.1 U6_U_16_RGBs6.15 | length 2.5
  Top Layer w0.1: v1(71.493,-1.592) 71.529,-1.592 72.501,-0.62 LED5_U_16_RGBs6.1@72.525,-0.62
  Bottom Layer w0.1: U6_U_16_RGBs6.15@71.493,-2.692 v1(71.493,-1.592)
B5_U_16_RGBs1: LED6_U_16_RGBs1.1 U6_U_16_RGBs1.13 | length 3.3
  Top Layer w0.1: LED6_U_16_RGBs1.1@-10.579,0.62 -10.555,0.62 -9.583,1.592 v1(-8.816,1.592)
  Bottom Layer w0.1: v1(-8.816,1.592) U6_U_16_RGBs1.13@-8.816,2.692
B5_U_16_RGBs2: LED6_U_16_RGBs2.1 U6_U_16_RGBs2.13 | length 3.3
  Top Layer w0.1: LED6_U_16_RGBs2.1@-42.596,0.628 -42.572,0.628 -41.6,1.6 v1(-40.834,1.6)
  Bottom Layer w0.1: v1(-40.834,1.6) U6_U_16_RGBs2.13@-40.834,2.701
B5_U_16_RGBs3: LED6_U_16_RGBs3.1 U6_U_16_RGBs3.13 | length 3.3
  Top Layer w0.1: LED6_U_16_RGBs3.1@-74.632,0.627 -74.608,0.627 -73.636,1.599 v1(-72.87,1.599)
  Bottom Layer w0.1: v1(-72.87,1.599) U6_U_16_RGBs3.13@-72.87,2.7
B5_U_16_RGBs4: LED6_U_16_RGBs4.1 U6_U_16_RGBs4.13 | length 3.3
  Top Layer w0.1: v1(8.762,-1.592) 9.529,-1.592 10.501,-0.62 LED6_U_16_RGBs4.1@10.525,-0.62
  Bottom Layer w0.1: U6_U_16_RGBs4.13@8.762,-2.692 v1(8.762,-1.592)
B5_U_16_RGBs5: LED6_U_16_RGBs5.1 U6_U_16_RGBs5.13 | length 3.3
  Top Layer w0.1: v1(40.762,-1.592) 41.529,-1.592 42.501,-0.62 LED6_U_16_RGBs5.1@42.525,-0.62
  Bottom Layer w0.1: U6_U_16_RGBs5.13@40.762,-2.692 v1(40.762,-1.592)
B5_U_16_RGBs6: LED6_U_16_RGBs6.1 U6_U_16_RGBs6.13 | length 3.3
  Top Layer w0.1: v1(72.763,-1.592) 73.529,-1.592 74.501,-0.62 LED6_U_16_RGBs6.1@74.525,-0.62
  Bottom Layer w0.1: U6_U_16_RGBs6.13@72.763,-2.692 v1(72.763,-1.592)
B6_U_16_RGBs1: LED7_U_16_RGBs1.1 U7_U_16_RGBs1.19 | length 4.6
  Top Layer w0.1: v1(-15.666,1.592) -15.291,1.217 -13.189,1.217 -13.004,1.032 -13.004,1.021 -12.603,0.62 LED7_U_16_RGBs1.1@-12.579,0.62
  Bottom Layer w0.1: v1(-15.666,1.592) U7_U_16_RGBs1.19@-15.666,2.692
B6_U_16_RGBs2: LED7_U_16_RGBs2.1 U7_U_16_RGBs2.19 | length 4.6
  Top Layer w0.1: v1(-47.684,1.6) -47.309,1.225 -45.206,1.225 -45.022,1.041 -45.022,1.029 -44.62,0.628 LED7_U_16_RGBs2.1@-44.596,0.628
  Bottom Layer w0.1: v1(-47.684,1.6) U7_U_16_RGBs2.19@-47.684,2.701
B6_U_16_RGBs3: LED7_U_16_RGBs3.1 U7_U_16_RGBs3.19 | length 4.6
  Top Layer w0.1: v1(-79.72,1.599) -79.345,1.224 -77.242,1.224 -77.058,1.04 -77.058,1.029 -76.657,0.627 LED7_U_16_RGBs3.1@-76.632,0.627
  Bottom Layer w0.1: v1(-79.72,1.599) U7_U_16_RGBs3.19@-79.72,2.7
B6_U_16_RGBs4: LED7_U_16_RGBs4.1 U7_U_16_RGBs4.19 | length 4.6
  Top Layer w0.1: LED7_U_16_RGBs4.1@12.525,-0.62 12.549,-0.62 12.95,-1.021 12.95,-1.032 13.135,-1.217 15.238,-1.217 v1(15.613,-1.592)
  Bottom Layer w0.1: U7_U_16_RGBs4.19@15.613,-2.692 v1(15.613,-1.592)
B6_U_16_RGBs5: LED7_U_16_RGBs5.1 U7_U_16_RGBs5.19 | length 4.6
  Top Layer w0.1: LED7_U_16_RGBs5.1@44.525,-0.62 44.549,-0.62 44.95,-1.021 44.95,-1.032 45.135,-1.217 47.238,-1.217 v1(47.613,-1.592)
  Bottom Layer w0.1: U7_U_16_RGBs5.19@47.613,-2.692 v1(47.613,-1.592)
B6_U_16_RGBs6: LED7_U_16_RGBs6.1 U7_U_16_RGBs6.19 | length 4.6
  Top Layer w0.1: LED7_U_16_RGBs6.1@76.525,-0.62 76.549,-0.62 76.95,-1.021 76.95,-1.032 77.135,-1.217 79.238,-1.217 v1(79.613,-1.592)
  Bottom Layer w0.1: U7_U_16_RGBs6.19@79.613,-2.692 v1(79.613,-1.592)
B7_U_16_RGBs1: LED8_U_16_RGBs1.1 U7_U_16_RGBs1.10 | length 6.4
  Top Layer w0.1: v1(-18.058,-1.349) -18.054,-1.344 -18.054,-0.207 -17.766,0.081 -15.118,0.081 -14.904,0.295 -14.904,0.319 -14.603,0.62 LED8_U_16_RGBs1.1@-14.579,0.62
  Bottom Layer w0.1: U7_U_16_RGBs1.10@-18.206,-2.692 -18.206,-1.592 -18.058,-1.443 v1(-18.058,-1.349)
B7_U_16_RGBs2: LED8_U_16_RGBs2.1 U7_U_16_RGBs2.10 | length 6.4
  Top Layer w0.1: v1(-50.075,-1.34) -50.071,-1.336 -50.071,-0.199 -49.783,0.089 -47.135,0.089 -46.921,0.303 -46.921,0.327 -46.62,0.628 LED8_U_16_RGBs2.1@-46.596,0.628
  Bottom Layer w0.1: U7_U_16_RGBs2.10@-50.224,-2.684 -50.224,-1.584 -50.075,-1.435 v1(-50.075,-1.34)
B7_U_16_RGBs3: LED8_U_16_RGBs3.1 U7_U_16_RGBs3.10 | length 6.4
  Top Layer w0.1: v1(-82.112,-1.341) -82.107,-1.337 -82.107,-0.2 -81.819,0.088 -79.171,0.088 -78.957,0.303 -78.957,0.327 -78.657,0.627 LED8_U_16_RGBs3.1@-78.632,0.627
  Bottom Layer w0.1: U7_U_16_RGBs3.10@-82.26,-2.685 -82.26,-1.584 -82.112,-1.436 v1(-82.112,-1.341)
B7_U_16_RGBs4: LED8_U_16_RGBs4.1 U7_U_16_RGBs4.10 | length 6.4
  Top Layer w0.1: LED8_U_16_RGBs4.1@14.525,-0.62 14.549,-0.62 14.85,-0.319 14.85,-0.295 15.064,-0.081 17.712,-0.081 18,0.207 18,1.344 v1(18.004,1.349)
  Bottom Layer w0.1: v1(18.004,1.349) 18.004,1.443 18.153,1.592 U7_U_16_RGBs4.10@18.153,2.692
B7_U_16_RGBs5: LED8_U_16_RGBs5.1 U7_U_16_RGBs5.10 | length 6.4
  Top Layer w0.1: LED8_U_16_RGBs5.1@46.525,-0.62 46.549,-0.62 46.85,-0.319 46.85,-0.295 47.064,-0.081 49.712,-0.081 50,0.207 50,1.344 v1(50.004,1.349)
  Bottom Layer w0.1: v1(50.004,1.349) 50.004,1.443 50.153,1.592 U7_U_16_RGBs5.10@50.153,2.692
B7_U_16_RGBs6: LED8_U_16_RGBs6.1 U7_U_16_RGBs6.10 | length 6.4
  Top Layer w0.1: LED8_U_16_RGBs6.1@78.525,-0.62 78.549,-0.62 78.85,-0.319 78.85,-0.295 79.064,-0.081 81.712,-0.081 82,0.207 82,1.344 v1(82.004,1.349)
  Bottom Layer w0.1: v1(82.004,1.349) 82.004,1.443 82.153,1.592 U7_U_16_RGBs6.10@82.153,2.692
B8_U_16_RGBs1: LED9_U_16_RGBs1.1 U7_U_16_RGBs1.17 | length 2.2
  Top Layer w0.1: v1(-16.936,1.592) -16.579,1.234 LED9_U_16_RGBs1.1@-16.579,0.62
  Bottom Layer w0.1: v1(-16.936,1.592) U7_U_16_RGBs1.17@-16.936,2.692
B8_U_16_RGBs2: LED9_U_16_RGBs2.1 U7_U_16_RGBs2.17 | length 2.2
  Top Layer w0.1: v1(-48.954,1.6) -48.596,1.242 LED9_U_16_RGBs2.1@-48.596,0.628
  Bottom Layer w0.1: v1(-48.954,1.6) U7_U_16_RGBs2.17@-48.954,2.701
B8_U_16_RGBs3: LED9_U_16_RGBs3.1 U7_U_16_RGBs3.17 | length 2.2
  Top Layer w0.1: v1(-80.99,1.599) -80.632,1.242 LED9_U_16_RGBs3.1@-80.632,0.627
  Bottom Layer w0.1: v1(-80.99,1.599) U7_U_16_RGBs3.17@-80.99,2.7
B8_U_16_RGBs4: LED9_U_16_RGBs4.1 U7_U_16_RGBs4.17 | length 2.2
  Top Layer w0.1: LED9_U_16_RGBs4.1@16.525,-0.62 16.525,-1.234 v1(16.883,-1.592)
  Bottom Layer w0.1: U7_U_16_RGBs4.17@16.883,-2.692 v1(16.883,-1.592)
B8_U_16_RGBs5: LED9_U_16_RGBs5.1 U7_U_16_RGBs5.17 | length 2.2
  Top Layer w0.1: LED9_U_16_RGBs5.1@48.525,-0.62 48.525,-1.234 v1(48.883,-1.592)
  Bottom Layer w0.1: U7_U_16_RGBs5.17@48.883,-2.692 v1(48.883,-1.592)
B8_U_16_RGBs6: LED9_U_16_RGBs6.1 U7_U_16_RGBs6.17 | length 2.2
  Top Layer w0.1: LED9_U_16_RGBs6.1@80.525,-0.62 80.525,-1.234 v1(80.883,-1.592)
  Bottom Layer w0.1: U7_U_16_RGBs6.17@80.883,-2.692 v1(80.883,-1.592)
B9_U_16_RGBs1: LED10_U_16_RGBs1.1 U7_U_16_RGBs1.15 | length 2.2
  Top Layer w0.1: LED10_U_16_RGBs1.1@-18.579,0.62 -18.579,1.219 v1(-18.206,1.592)
  Bottom Layer w0.1: v1(-18.206,1.592) U7_U_16_RGBs1.15@-18.206,2.692
B9_U_16_RGBs2: LED10_U_16_RGBs2.1 U7_U_16_RGBs2.15 | length 2.2
  Top Layer w0.1: LED10_U_16_RGBs2.1@-50.596,0.628 -50.596,1.228 v1(-50.224,1.6)
  Bottom Layer w0.1: v1(-50.224,1.6) U7_U_16_RGBs2.15@-50.224,2.701
B9_U_16_RGBs3: LED10_U_16_RGBs3.1 U7_U_16_RGBs3.15 | length 2.2
  Top Layer w0.1: LED10_U_16_RGBs3.1@-82.632,0.627 -82.632,1.227 v1(-82.26,1.599)
  Bottom Layer w0.1: v1(-82.26,1.599) U7_U_16_RGBs3.15@-82.26,2.7
B9_U_16_RGBs4: LED10_U_16_RGBs4.1 U7_U_16_RGBs4.15 | length 2.2
  Top Layer w0.1: v1(18.153,-1.592) 18.525,-1.219 LED10_U_16_RGBs4.1@18.525,-0.62
  Bottom Layer w0.1: U7_U_16_RGBs4.15@18.153,-2.692 v1(18.153,-1.592)
B9_U_16_RGBs5: LED10_U_16_RGBs5.1 U7_U_16_RGBs5.15 | length 2.2
  Top Layer w0.1: v1(50.153,-1.592) 50.525,-1.219 LED10_U_16_RGBs5.1@50.525,-0.62
  Bottom Layer w0.1: U7_U_16_RGBs5.15@50.153,-2.692 v1(50.153,-1.592)
B9_U_16_RGBs6: LED10_U_16_RGBs6.1 U7_U_16_RGBs6.15 | length 2.2
  Top Layer w0.1: v1(82.153,-1.592) 82.525,-1.219 LED10_U_16_RGBs6.1@82.525,-0.62
  Bottom Layer w0.1: U7_U_16_RGBs6.15@82.153,-2.692 v1(82.153,-1.592)
B10_U_16_RGBs1: LED11_U_16_RGBs1.1 U7_U_16_RGBs1.13 | length 2.6
  Top Layer w0.1: LED11_U_16_RGBs1.1@-20.579,0.62 -20.555,0.62 -19.65,1.525 -19.543,1.525 v1(-19.476,1.592)
  Bottom Layer w0.1: v1(-19.476,1.592) U7_U_16_RGBs1.13@-19.476,2.692
B10_U_16_RGBs2: LED11_U_16_RGBs2.1 U7_U_16_RGBs2.13 | length 2.6
  Top Layer w0.1: LED11_U_16_RGBs2.1@-52.596,0.628 -52.572,0.628 -51.667,1.533 -51.561,1.533 v1(-51.494,1.6)
  Bottom Layer w0.1: v1(-51.494,1.6) U7_U_16_RGBs2.13@-51.494,2.701
B10_U_16_RGBs3: LED11_U_16_RGBs3.1 U7_U_16_RGBs3.13 | length 2.6
  Top Layer w0.1: LED11_U_16_RGBs3.1@-84.632,0.627 -84.608,0.627 -83.703,1.532 -83.597,1.532 v1(-83.53,1.599)
  Bottom Layer w0.1: v1(-83.53,1.599) U7_U_16_RGBs3.13@-83.53,2.7
B10_U_16_RGBs4: LED11_U_16_RGBs4.1 U7_U_16_RGBs4.13 | length 2.6
  Top Layer w0.1: v1(19.423,-1.592) 19.489,-1.525 19.596,-1.525 20.501,-0.62 LED11_U_16_RGBs4.1@20.525,-0.62
  Bottom Layer w0.1: U7_U_16_RGBs4.13@19.423,-2.692 v1(19.423,-1.592)
B10_U_16_RGBs5: LED11_U_16_RGBs5.1 U7_U_16_RGBs5.13 | length 2.6
  Top Layer w0.1: v1(51.423,-1.592) 51.489,-1.525 51.596,-1.525 52.501,-0.62 LED11_U_16_RGBs5.1@52.525,-0.62
  Bottom Layer w0.1: U7_U_16_RGBs5.13@51.423,-2.692 v1(51.423,-1.592)
B10_U_16_RGBs6: LED11_U_16_RGBs6.1 U7_U_16_RGBs6.13 | length 2.6
  Top Layer w0.1: v1(83.423,-1.592) 83.489,-1.525 83.596,-1.525 84.501,-0.62 LED11_U_16_RGBs6.1@84.525,-0.62
  Bottom Layer w0.1: U7_U_16_RGBs6.13@83.423,-2.692 v1(83.423,-1.592)
B11_U_16_RGBs1: LED12_U_16_RGBs1.1 U8_U_16_RGBs1.19 | length 5.3
  Top Layer w0.1: v1(-26.336,1.592) -25.961,1.217 -23.189,1.217 -23.004,1.032 -23.004,1.021 -22.603,0.62 LED12_U_16_RGBs1.1@-22.579,0.62
  Bottom Layer w0.1: v1(-26.336,1.592) U8_U_16_RGBs1.19@-26.336,2.692
B11_U_16_RGBs2: LED12_U_16_RGBs2.1 U8_U_16_RGBs2.19 | length 5.3
  Top Layer w0.1: v1(-58.354,1.6) -57.979,1.225 -55.206,1.225 -55.022,1.041 -55.022,1.029 -54.62,0.628 LED12_U_16_RGBs2.1@-54.596,0.628
  Bottom Layer w0.1: v1(-58.354,1.6) U8_U_16_RGBs2.19@-58.354,2.701
B11_U_16_RGBs3: LED12_U_16_RGBs3.1 U8_U_16_RGBs3.19 | length 5.3
  Top Layer w0.1: v1(-90.39,1.599) -90.015,1.224 -87.242,1.224 -87.058,1.04 -87.058,1.029 -86.657,0.627 LED12_U_16_RGBs3.1@-86.632,0.627
  Bottom Layer w0.1: v1(-90.39,1.599) U8_U_16_RGBs3.19@-90.39,2.7
B11_U_16_RGBs4: LED12_U_16_RGBs4.1 U8_U_16_RGBs4.19 | length 5.3
  Top Layer w0.1: LED12_U_16_RGBs4.1@22.525,-0.62 22.549,-0.62 22.95,-1.021 22.95,-1.032 23.135,-1.217 25.907,-1.217 v1(26.283,-1.592)
  Bottom Layer w0.1: U8_U_16_RGBs4.19@26.283,-2.692 v1(26.283,-1.592)
B11_U_16_RGBs5: LED12_U_16_RGBs5.1 U8_U_16_RGBs5.19 | length 5.3
  Top Layer w0.1: LED12_U_16_RGBs5.1@54.525,-0.62 54.549,-0.62 54.95,-1.021 54.95,-1.032 55.135,-1.217 57.907,-1.217 v1(58.282,-1.592)
  Bottom Layer w0.1: U8_U_16_RGBs5.19@58.282,-2.692 v1(58.282,-1.592)
B11_U_16_RGBs6: LED12_U_16_RGBs6.1 U8_U_16_RGBs6.19 | length 5.3
  Top Layer w0.1: LED12_U_16_RGBs6.1@86.525,-0.62 86.549,-0.62 86.95,-1.021 86.95,-1.032 87.135,-1.217 89.908,-1.217 v1(90.283,-1.592)
  Bottom Layer w0.1: U8_U_16_RGBs6.19@90.283,-2.692 v1(90.283,-1.592)
B12_U_16_RGBs1: LED13_U_16_RGBs1.1 U8_U_16_RGBs1.9 | length 6.4
  Top Layer w0.1: v1(-28.054,-1.272) -28.054,-0.207 -27.927,-0.081 -25.292,-0.081 -25.004,0.207 -25.004,0.219 -24.603,0.62 LED13_U_16_RGBs1.1@-24.579,0.62
  Bottom Layer w0.1: U8_U_16_RGBs1.9@-28.241,-2.692 -28.241,-1.668 -28.121,-1.547 -28.121,-1.338 v1(-28.054,-1.272)
B12_U_16_RGBs2: LED13_U_16_RGBs2.1 U8_U_16_RGBs2.9 | length 6.4
  Top Layer w0.1: v1(-60.071,-1.263) -60.071,-0.199 -59.944,-0.073 -57.309,-0.073 -57.022,0.215 -57.022,0.227 -56.62,0.628 LED13_U_16_RGBs2.1@-56.596,0.628
  Bottom Layer w0.1: U8_U_16_RGBs2.9@-60.259,-2.684 -60.259,-1.66 -60.138,-1.539 -60.138,-1.33 v1(-60.071,-1.263)
B12_U_16_RGBs3: LED13_U_16_RGBs3.1 U8_U_16_RGBs3.9 | length 6.4
  Top Layer w0.1: v1(-92.107,-1.264) -92.107,-0.2 -91.981,-0.073 -89.346,-0.073 -89.058,0.215 -89.058,0.226 -88.657,0.627 LED13_U_16_RGBs3.1@-88.632,0.627
  Bottom Layer w0.1: U8_U_16_RGBs3.9@-92.295,-2.685 -92.295,-1.66 -92.174,-1.539 -92.174,-1.331 v1(-92.107,-1.264)
B12_U_16_RGBs4: LED13_U_16_RGBs4.1 U8_U_16_RGBs4.9 | length 6.4
  Top Layer w0.1: LED13_U_16_RGBs4.1@24.525,-0.62 24.549,-0.62 24.95,-0.219 24.95,-0.207 25.238,0.081 27.873,0.081 28,0.207 v1(28,1.272)
  Bottom Layer w0.1: v1(28,1.272) 28.067,1.338 28.067,1.547 28.188,1.668 U8_U_16_RGBs4.9@28.188,2.692
B12_U_16_RGBs5: LED13_U_16_RGBs5.1 U8_U_16_RGBs5.9 | length 6.4
  Top Layer w0.1: LED13_U_16_RGBs5.1@56.525,-0.62 56.549,-0.62 56.95,-0.219 56.95,-0.207 57.238,0.081 59.873,0.081 60,0.207 v1(60,1.272)
  Bottom Layer w0.1: v1(60,1.272) 60.067,1.338 60.067,1.547 60.187,1.668 U8_U_16_RGBs5.9@60.187,2.692
B12_U_16_RGBs6: LED13_U_16_RGBs6.1 U8_U_16_RGBs6.9 | length 6.4
  Top Layer w0.1: LED13_U_16_RGBs6.1@88.525,-0.62 88.549,-0.62 88.95,-0.219 88.95,-0.207 89.238,0.081 91.873,0.081 92,0.207 v1(92,1.272)
  Bottom Layer w0.1: v1(92,1.272) 92.067,1.338 92.067,1.547 92.188,1.668 U8_U_16_RGBs6.9@92.188,2.692
B13_U_16_RGBs1: LED14_U_16_RGBs1.1 U8_U_16_RGBs1.18 | length 2.3
  Top Layer w0.1: v1(-26.997,1.617) -26.579,1.199 LED14_U_16_RGBs1.1@-26.579,0.62
  Bottom Layer w0.1: v1(-26.997,1.617) -26.984,1.63 -26.984,2.68 U8_U_16_RGBs1.18@-26.971,2.692
B13_U_16_RGBs2: LED14_U_16_RGBs2.1 U8_U_16_RGBs2.18 | length 2.2
  Top Layer w0.1: v1(-58.989,1.6) -58.596,1.207 LED14_U_16_RGBs2.1@-58.596,0.628
  Bottom Layer w0.1: v1(-58.989,1.6) U8_U_16_RGBs2.18@-58.989,2.701
B13_U_16_RGBs3: LED14_U_16_RGBs3.1 U8_U_16_RGBs3.18 | length 2.2
  Top Layer w0.1: v1(-91.025,1.599) -90.632,1.207 LED14_U_16_RGBs3.1@-90.632,0.627
  Bottom Layer w0.1: v1(-91.025,1.599) U8_U_16_RGBs3.18@-91.025,2.7
B13_U_16_RGBs4: LED14_U_16_RGBs4.1 U8_U_16_RGBs4.18 | length 2.2
  Top Layer w0.1: LED14_U_16_RGBs4.1@26.525,-0.62 26.525,-1.199 v1(26.918,-1.592)
  Bottom Layer w0.1: U8_U_16_RGBs4.18@26.918,-2.692 v1(26.918,-1.592)
B13_U_16_RGBs5: LED14_U_16_RGBs5.1 U8_U_16_RGBs5.18 | length 2.2
  Top Layer w0.1: LED14_U_16_RGBs5.1@58.525,-0.62 58.525,-1.199 v1(58.917,-1.592)
  Bottom Layer w0.1: U8_U_16_RGBs5.18@58.917,-2.692 v1(58.917,-1.592)
B13_U_16_RGBs6: LED14_U_16_RGBs6.1 U8_U_16_RGBs6.18 | length 2.2
  Top Layer w0.1: LED14_U_16_RGBs6.1@90.525,-0.62 90.525,-1.199 v1(90.918,-1.592)
  Bottom Layer w0.1: U8_U_16_RGBs6.18@90.918,-2.692 v1(90.918,-1.592)
B14_U_16_RGBs1: LED15_U_16_RGBs1.1 U8_U_16_RGBs1.16 | length 2.2
  Top Layer w0.1: LED15_U_16_RGBs1.1@-28.579,0.62 -28.579,1.254 v1(-28.241,1.592)
  Bottom Layer w0.1: v1(-28.241,1.592) U8_U_16_RGBs1.16@-28.241,2.692
B14_U_16_RGBs2: LED15_U_16_RGBs2.1 U8_U_16_RGBs2.16 | length 2.2
  Top Layer w0.1: LED15_U_16_RGBs2.1@-60.596,0.628 -60.596,1.263 v1(-60.259,1.6)
  Bottom Layer w0.1: v1(-60.259,1.6) U8_U_16_RGBs2.16@-60.259,2.701
B14_U_16_RGBs3: LED15_U_16_RGBs3.1 U8_U_16_RGBs3.16 | length 2.2
  Top Layer w0.1: LED15_U_16_RGBs3.1@-92.632,0.627 -92.632,1.262 v1(-92.295,1.599)
  Bottom Layer w0.1: v1(-92.295,1.599) U8_U_16_RGBs3.16@-92.295,2.7
B14_U_16_RGBs4: LED15_U_16_RGBs4.1 U8_U_16_RGBs4.16 | length 2.2
  Top Layer w0.1: v1(28.188,-1.592) 28.525,-1.254 LED15_U_16_RGBs4.1@28.525,-0.62
  Bottom Layer w0.1: U8_U_16_RGBs4.16@28.188,-2.692 v1(28.188,-1.592)
B14_U_16_RGBs5: LED15_U_16_RGBs5.1 U8_U_16_RGBs5.16 | length 2.2
  Top Layer w0.1: v1(60.187,-1.592) 60.525,-1.254 LED15_U_16_RGBs5.1@60.525,-0.62
  Bottom Layer w0.1: U8_U_16_RGBs5.16@60.187,-2.692 v1(60.187,-1.592)
B14_U_16_RGBs6: LED15_U_16_RGBs6.1 U8_U_16_RGBs6.16 | length 2.2
  Top Layer w0.1: v1(92.188,-1.592) 92.525,-1.254 LED15_U_16_RGBs6.1@92.525,-0.62
  Bottom Layer w0.1: U8_U_16_RGBs6.16@92.188,-2.692 v1(92.188,-1.592)
B15_U_16_RGBs1: LED16_U_16_RGBs1.1 U8_U_16_RGBs1.14 | length 2.6
  Top Layer w0.1: LED16_U_16_RGBs1.1@-30.579,0.62 -30.555,0.62 -29.583,1.592 v1(-29.511,1.592)
  Bottom Layer w0.1: v1(-29.511,1.592) U8_U_16_RGBs1.14@-29.511,2.692
B15_U_16_RGBs2: LED16_U_16_RGBs2.1 U8_U_16_RGBs2.14 | length 2.6
  Top Layer w0.1: LED16_U_16_RGBs2.1@-62.596,0.628 -62.572,0.628 -61.6,1.6 v1(-61.529,1.6)
  Bottom Layer w0.1: v1(-61.529,1.6) U8_U_16_RGBs2.14@-61.529,2.701
B15_U_16_RGBs3: LED16_U_16_RGBs3.1 U8_U_16_RGBs3.14 | length 2.6
  Top Layer w0.1: LED16_U_16_RGBs3.1@-94.632,0.627 -94.608,0.627 -93.636,1.599 v1(-93.565,1.599)
  Bottom Layer w0.1: v1(-93.565,1.599) U8_U_16_RGBs3.14@-93.565,2.7
B15_U_16_RGBs4: LED16_U_16_RGBs4.1 U8_U_16_RGBs4.14 | length 2.6
  Top Layer w0.1: v1(29.458,-1.592) 29.529,-1.592 30.501,-0.62 LED16_U_16_RGBs4.1@30.525,-0.62
  Bottom Layer w0.1: U8_U_16_RGBs4.14@29.458,-2.692 v1(29.458,-1.592)
B15_U_16_RGBs5: LED16_U_16_RGBs5.1 U8_U_16_RGBs5.14 | length 2.6
  Top Layer w0.1: v1(61.457,-1.592) 61.529,-1.592 62.501,-0.62 LED16_U_16_RGBs5.1@62.525,-0.62
  Bottom Layer w0.1: U8_U_16_RGBs5.14@61.457,-2.692 v1(61.457,-1.592)
B15_U_16_RGBs6: LED16_U_16_RGBs6.1 U8_U_16_RGBs6.14 | length 2.6
  Top Layer w0.1: v1(93.458,-1.592) 93.529,-1.592 94.501,-0.62 LED16_U_16_RGBs6.1@94.525,-0.62
  Bottom Layer w0.1: U8_U_16_RGBs6.14@93.458,-2.692 v1(93.458,-1.592)
BOOTSEL_ESP: MD1.23 SW4.2 | length 6.4
  Top Layer w0.1: SW4.2@-7.575,-11 -6.9,-11 -6.606,-10.706 -6.606,-10.144 -6.362,-9.9 -5.538,-9.9 -4.844,-9.206 -4.844,-7.994 -4,-7.15 MD1.23@-4,-6.95
BOOTSEL_RP: R6.1 SW1.2 | length 3.1
  Top Layer w0.1: R6.1@-10.827,20.225 -10.827,20.198 -10.075,19.447 SW1.2@-10.075,17.4
CLK_U_16_RGBs1: U1.15 U6_U_16_RGBs1.3 U6_U_16_RGBs2.3 U6_U_16_RGBs3.3 U7_U_16_RGBs1.3 U7_U_16_RGBs2.3 U7_U_16_RGBs3.3 U8_U_16_RGBs1.3 U8_U_16_RGBs2.3 U8_U_16_RGBs3.3 | length 117.4
  Top Layer w0.1: v1(2.171,9.72) 2.238,9.653 2.238,9.511 2.526,9.223 2.54,9.223 2.688,9.075 U1.15@3.025,9.075
  Bottom Layer w0.1: U8_U_16_RGBs3.3@-88.485,-2.685 -88.485,-3.258 -87.685,-4.058 -77.015,-4.058 ; U7_U_16_RGBs3.3@-77.815,-2.685 -77.815,-3.258 -77.015,-4.058 ; U6_U_16_RGBs3.3@-67.155,-2.685 -67.155,-3.258 -66.355,-4.058 ; U8_U_16_RGBs2.3@-56.449,-2.684 -56.449,-3.257 -55.648,-4.058 ; U7_U_16_RGBs2.3@-45.779,-2.684 -45.779,-3.257 -44.978,-4.058 ; U6_U_16_RGBs2.3@-35.119,-2.684 -35.119,-3.257 -34.318,-4.058 ; U8_U_16_RGBs1.3@-24.431,-2.692 -24.431,-3.265 -23.639,-4.058 ; U7_U_16_RGBs1.3@-13.761,-2.692 -13.761,-3.265 -12.969,-4.058 ; v1(2.171,9.72) 2.171,9.677 2.875,8.973 2.875,7.803 2.663,7.591 2.137,7.591 1.917,7.371 1.917,7.061 2.025,6.953 2.025,5.651 1.871,5.497 1.871,5.186 2.025,5.032 2.025,4.878 1.754,4.607 1.754,3.884 0.35,2.48 0.35,-0.5 0.025,-0.825 -0.742,-0.825 -1.709,-1.792 -2.702,-1.792 -2.934,-2.024 -2.937,-2.024 -3.101,-2.189 U6_U_16_RGBs1.3@-3.101,-2.692 -3.114,-2.705 -3.114,-3.743 -3.304,-3.933 -3.304,-3.945 -3.524,-4.165 -3.536,-4.165 -3.537,-4.166 -3.848,-4.166 -3.956,-4.058 -12.969,-4.058 ; -77.015,-4.058 -66.355,-4.058 ; -66.355,-4.058 -55.648,-4.058 ; -55.648,-4.058 -44.978,-4.058 ; -44.978,-4.058 -34.318,-4.058 ; -34.318,-4.058 -23.639,-4.058 ; -23.639,-4.058 -12.969,-4.058
CLK_U_16_RGBs4: U1.29 U6_U_16_RGBs4.3 U6_U_16_RGBs5.3 U6_U_16_RGBs6.3 U7_U_16_RGBs4.3 U7_U_16_RGBs5.3 U7_U_16_RGBs6.3 U8_U_16_RGBs4.3 U8_U_16_RGBs5.3 U8_U_16_RGBs6.3 | length 115.5
  Top Layer w0.1: v1(9,7.425) U1.29@8.999,8.3
  Bottom Layer w0.1: v1(9,7.425) 8.423,7.425 8.309,7.538 7.827,7.538 6.132,5.843 6.132,4.081 5.676,3.625 5.195,3.625 4.79,4.03 3.845,4.03 3.64,3.825 3.637,3.825 3.437,3.625 3.407,3.625 3.047,3.265 3.047,1.725 2.773,1.451 2.773,1.14 2.993,0.92 9.011,0.92 9.643,1.552 9.643,1.866 9.863,2.086 11.324,2.086 12.049,1.361 12.049,1.266 12.395,0.92 12.655,0.92 ; U7_U_16_RGBs4.3@13.708,2.692 13.659,2.643 13.659,1.924 12.655,0.92 ; U8_U_16_RGBs4.3@24.378,2.692 24.378,2.12 23.173,0.915 ; U6_U_16_RGBs5.3@35.047,2.692 35.047,1.312 34.632,0.897 ; U7_U_16_RGBs5.3@45.708,2.692 45.708,2.12 45.169,1.582 45.169,1.434 44.632,0.897 ; U8_U_16_RGBs5.3@56.377,2.692 56.377,2.12 55.154,0.897 ; U6_U_16_RGBs6.3@67.048,2.692 67.048,1.312 66.632,0.897 ; U7_U_16_RGBs6.3@77.708,2.692 77.708,2.05 76.947,1.289 76.947,0.897 ; U8_U_16_RGBs6.3@88.378,2.692 88.375,2.69 88.375,1.85 87.421,0.897 76.947,0.897 ; 12.655,0.92 12.661,0.915 23.173,0.915 ; 23.173,0.915 23.191,0.897 34.632,0.897 ; 34.632,0.897 44.632,0.897 ; 44.632,0.897 55.154,0.897 ; 55.154,0.897 66.632,0.897 ; 66.632,0.897 76.947,0.897
ESP_USB_D_N: MD1.26 U10.4 | length 40.6
  Top Layer w0.261: v1(-21.483,-1.733) -21.483,-1.784 -21.388,-1.879 -21.388,-1.888 -18.796,-4.48 -9.638,-4.48 -7.261,-6.858 -7.261,-8.215 -6.658,-8.818 -6.268,-8.818 -6.1,-8.65 MD1.26@-5.9,-8.65 ; -17.369,15.269 -17.369,15.55 -17.369,15.913 -17.171,16.112 v1(-17.171,16.163)
  GND w0.261: v1(-21.483,-1.733) -21.467,-1.717 -21.467,-1.277 -21.731,-1.014 -21.731,1.509 -21.295,1.945 -21.295,1.954 -21.2,2.049 v1(-21.2,2.1)
  Bottom Layer w0.261: v1(-21.2,2.1) -21.149,2.1 -21.054,2.195 -21.045,2.195 -20.549,2.69 -20.549,9.615 -19.507,10.658 -19.507,13.352 -18.439,14.419 -17.986,14.419 -17.129,15.277 -17.129,15.988 -17.135,15.993 -17.135,16.127 v1(-17.171,16.163)
ESP_USB_D_P: MD1.27 U10.3 | length 42
  Top Layer w0.261: v1(-21.872,-2.122) -21.821,-2.122 -21.726,-2.216 -21.717,-2.216 -18.988,-4.944 -9.83,-4.944 -7.725,-7.05 -7.725,-8.408 -6.85,-9.282 -6.268,-9.282 -6.1,-9.45 MD1.27@-5.9,-9.45 ; U10.3@-16.869,15.35 -16.869,15.757 -16.707,15.919 -16.707,15.973 -16.624,16.056 v1(-16.624,16.107)
  GND w0.261: v1(-21.872,-2.122) -21.836,-2.158 -21.714,-2.158 -21.675,-2.197 -21.291,-2.197 -21.003,-1.909 -21.003,-1.085 -21.267,-0.822 -21.267,1.316 -20.966,1.617 -20.957,1.617 -20.862,1.711 v1(-20.811,1.711)
  Bottom Layer w0.261: v1(-20.811,1.711) -20.811,1.762 -20.717,1.857 -20.717,1.866 -20.085,2.498 -20.085,9.423 -19.043,10.465 -19.043,13.159 -18.247,13.955 -17.794,13.955 -16.665,15.084 -16.665,15.932 -16.66,15.938 -16.66,16.071 v1(-16.624,16.107)
G0_U_16_RGBs1: LED1_U_16_RGBs1.3 U6_U_16_RGBs1.19 | length 5
  Top Layer w0.1: v1(-5.006,1.592) -4.631,1.217 -2.15,1.217 -1.553,0.62 LED1_U_16_RGBs1.3@-1.529,0.62
  Bottom Layer w0.1: v1(-5.006,1.592) U6_U_16_RGBs1.19@-5.006,2.692
G0_U_16_RGBs2: LED1_U_16_RGBs2.3 U6_U_16_RGBs2.19 | length 5
  Top Layer w0.1: v1(-37.024,1.6) -36.649,1.225 -34.167,1.225 -33.57,0.628 LED1_U_16_RGBs2.3@-33.546,0.628
  Bottom Layer w0.1: v1(-37.024,1.6) U6_U_16_RGBs2.19@-37.024,2.701
G0_U_16_RGBs3: LED1_U_16_RGBs3.3 U6_U_16_RGBs3.19 | length 5
  Top Layer w0.1: v1(-69.06,1.599) -68.685,1.224 -66.204,1.224 -65.607,0.627 LED1_U_16_RGBs3.3@-65.582,0.627
  Bottom Layer w0.1: v1(-69.06,1.599) U6_U_16_RGBs3.19@-69.06,2.7
G0_U_16_RGBs4: LED1_U_16_RGBs4.3 U6_U_16_RGBs4.19 | length 5
  Top Layer w0.1: LED1_U_16_RGBs4.3@1.475,-0.62 1.499,-0.62 2.096,-1.217 4.577,-1.217 v1(4.952,-1.592)
  Bottom Layer w0.1: U6_U_16_RGBs4.19@4.952,-2.692 v1(4.952,-1.592)
G0_U_16_RGBs5: LED1_U_16_RGBs5.3 U6_U_16_RGBs5.19 | length 5
  Top Layer w0.1: LED1_U_16_RGBs5.3@33.475,-0.62 33.499,-0.62 34.096,-1.217 36.577,-1.217 v1(36.952,-1.592)
  Bottom Layer w0.1: U6_U_16_RGBs5.19@36.952,-2.692 v1(36.952,-1.592)
G0_U_16_RGBs6: LED1_U_16_RGBs6.3 U6_U_16_RGBs6.19 | length 5
  Top Layer w0.1: LED1_U_16_RGBs6.3@65.475,-0.62 65.499,-0.62 66.096,-1.217 68.578,-1.217 v1(68.953,-1.592)
  Bottom Layer w0.1: U6_U_16_RGBs6.19@68.953,-2.692 v1(68.953,-1.592)
G1_U_16_RGBs1: LED2_U_16_RGBs1.3 U6_U_16_RGBs1.9 | length 8
  Top Layer w0.1: v1(-6.574,-3.671) -6.574,-2.978 -6.887,-2.664 -6.887,-2.066 -6.568,-1.747 -6.568,-1.586 -6.563,-1.58 -6.563,-1.378 -6.401,-1.217 -6.239,-1.217 -6.054,-1.032 -6.054,-0.207 -5.966,-0.119 -4.292,-0.119 -3.553,0.62 LED2_U_16_RGBs1.3@-3.529,0.62
  Bottom Layer w0.1: U6_U_16_RGBs1.9@-6.911,-2.692 -6.911,-3.299 -6.574,-3.637 v1(-6.574,-3.671)
G1_U_16_RGBs2: LED2_U_16_RGBs2.3 U6_U_16_RGBs2.9 | length 8
  Top Layer w0.1: v1(-38.591,-3.663) -38.591,-2.969 -38.904,-2.656 -38.904,-2.058 -38.585,-1.739 -38.585,-1.376 -38.418,-1.209 -38.256,-1.209 -38.071,-1.024 -38.071,-0.199 -37.983,-0.111 -36.309,-0.111 -35.57,0.628 LED2_U_16_RGBs2.3@-35.546,0.628
  Bottom Layer w0.1: U6_U_16_RGBs2.9@-38.929,-2.684 -38.929,-3.291 -38.591,-3.629 v1(-38.591,-3.663)
G1_U_16_RGBs3: LED2_U_16_RGBs3.3 U6_U_16_RGBs3.9 | length 8
  Top Layer w0.1: v1(-70.627,-3.663) -70.627,-2.97 -70.941,-2.657 -70.941,-2.058 -70.622,-1.74 -70.622,-1.376 -70.455,-1.209 -70.292,-1.209 -70.107,-1.024 -70.107,-0.2 -70.019,-0.112 -68.346,-0.112 -67.607,0.627 LED2_U_16_RGBs3.3@-67.582,0.627
  Bottom Layer w0.1: U6_U_16_RGBs3.9@-70.965,-2.685 -70.965,-3.291 -70.627,-3.629 v1(-70.627,-3.663)
G1_U_16_RGBs4: LED2_U_16_RGBs4.3 U6_U_16_RGBs4.9 | length 8
  Top Layer w0.1: LED2_U_16_RGBs4.3@3.475,-0.62 3.499,-0.62 4.238,0.119 5.912,0.119 6,0.207 6,1.032 6.185,1.217 6.347,1.217 6.514,1.384 6.514,1.747 6.833,2.066 6.833,2.664 6.52,2.978 6.52,3.634 v1(6.546,3.66)
  Bottom Layer w0.1: v1(6.546,3.66) 6.546,3.618 6.857,3.307 U6_U_16_RGBs4.9@6.857,2.692